# Altium PCB ES.PcbDoc (part 1 of 2)
Units mm, origin at the board's own origin, x right, y up, seen from the top; angles counter-clockwise.
Board outline 100.25 x 100.25 mm, 2 copper layers (Top Layer, Bottom Layer); 101 components, 47 nets, 272 pads, 52 vias.
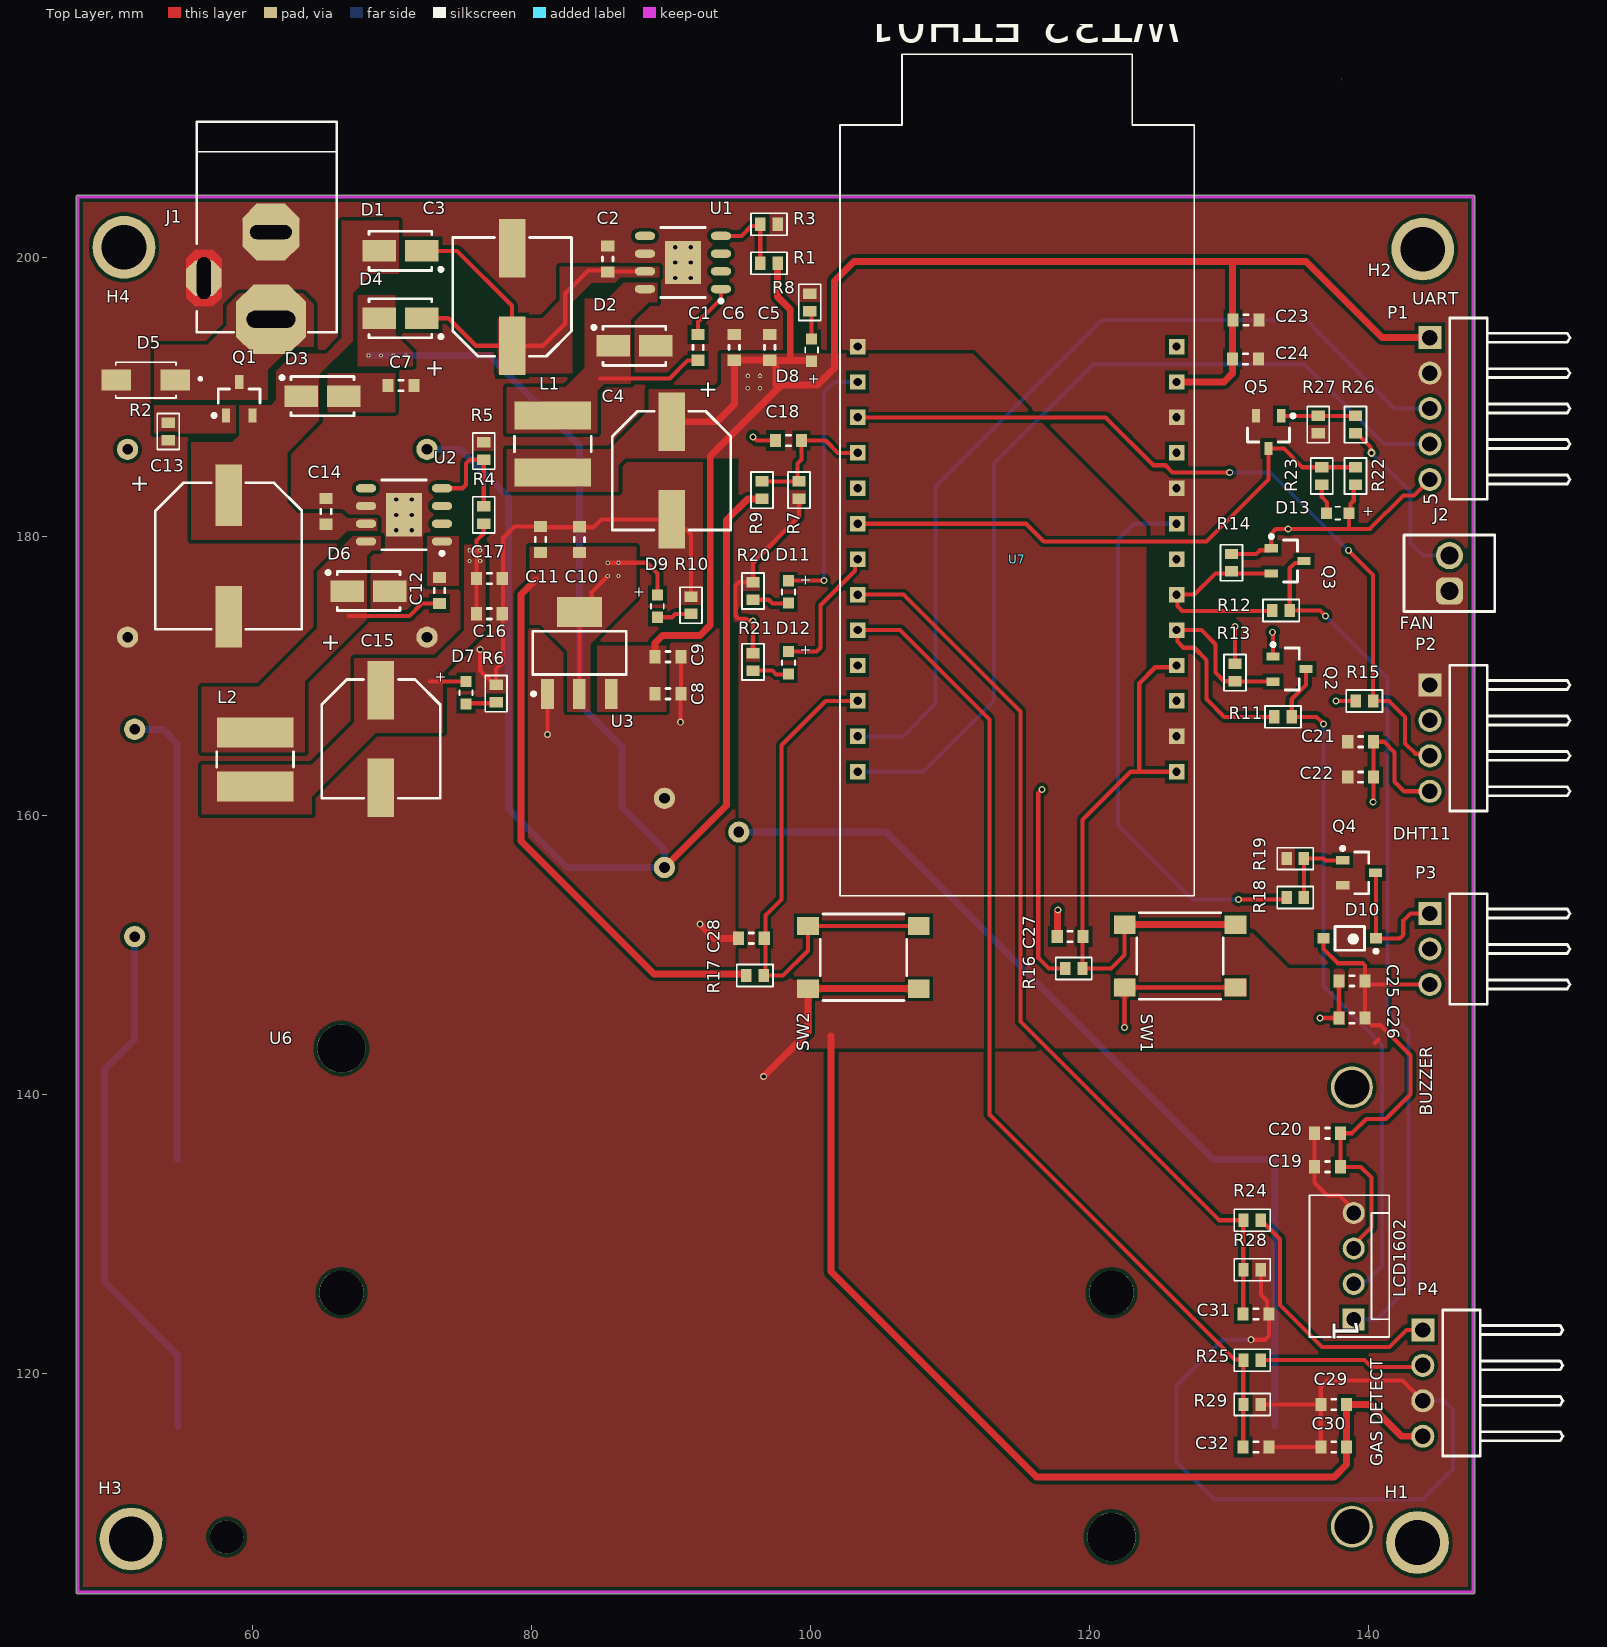
[diagram p0: Top Layer view]
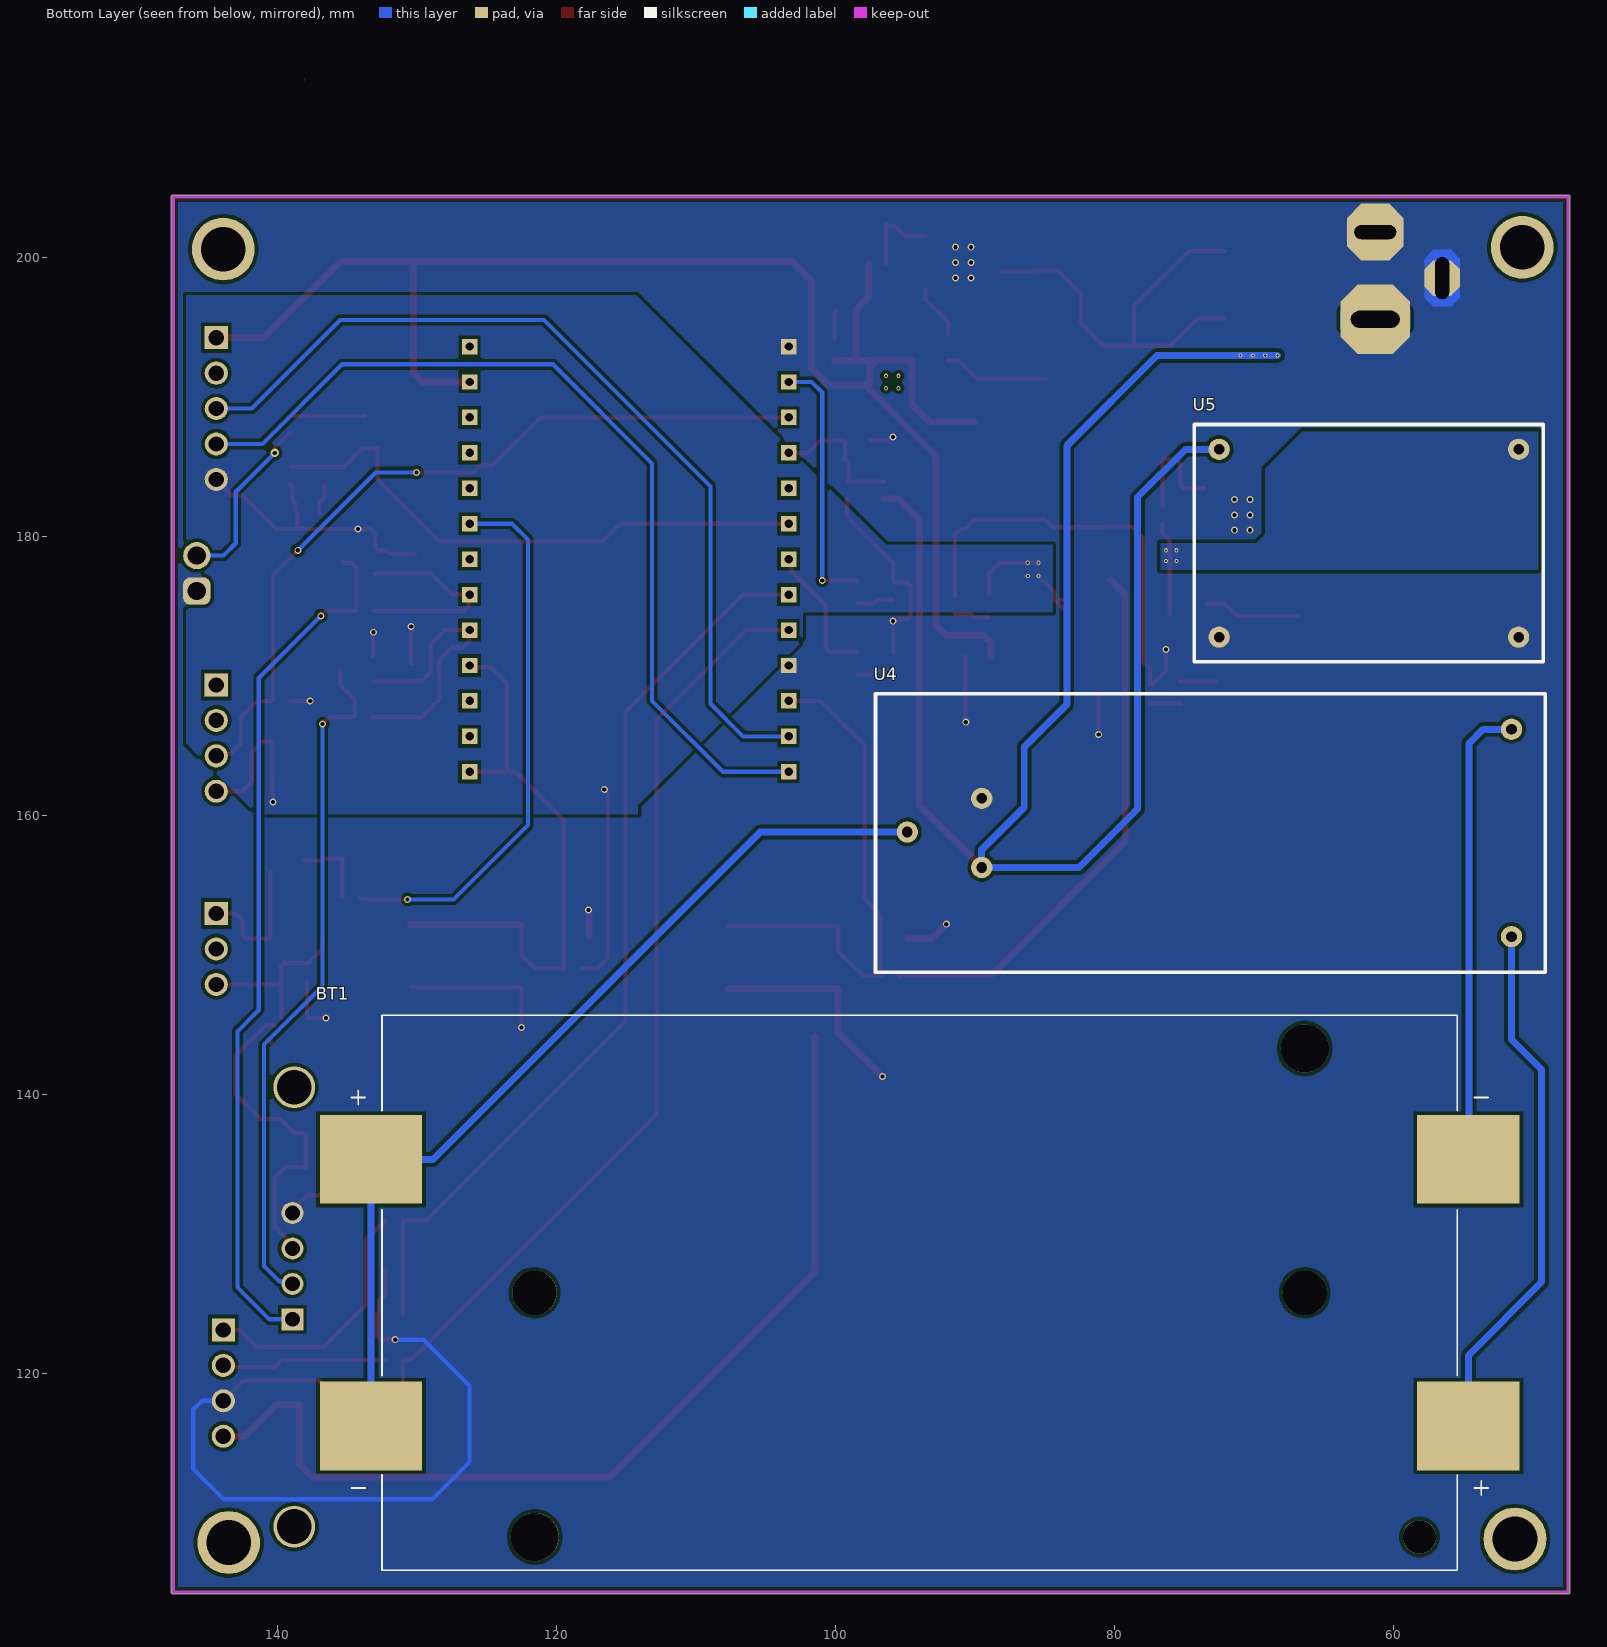
[diagram p1: Bottom Layer view, seen from below]
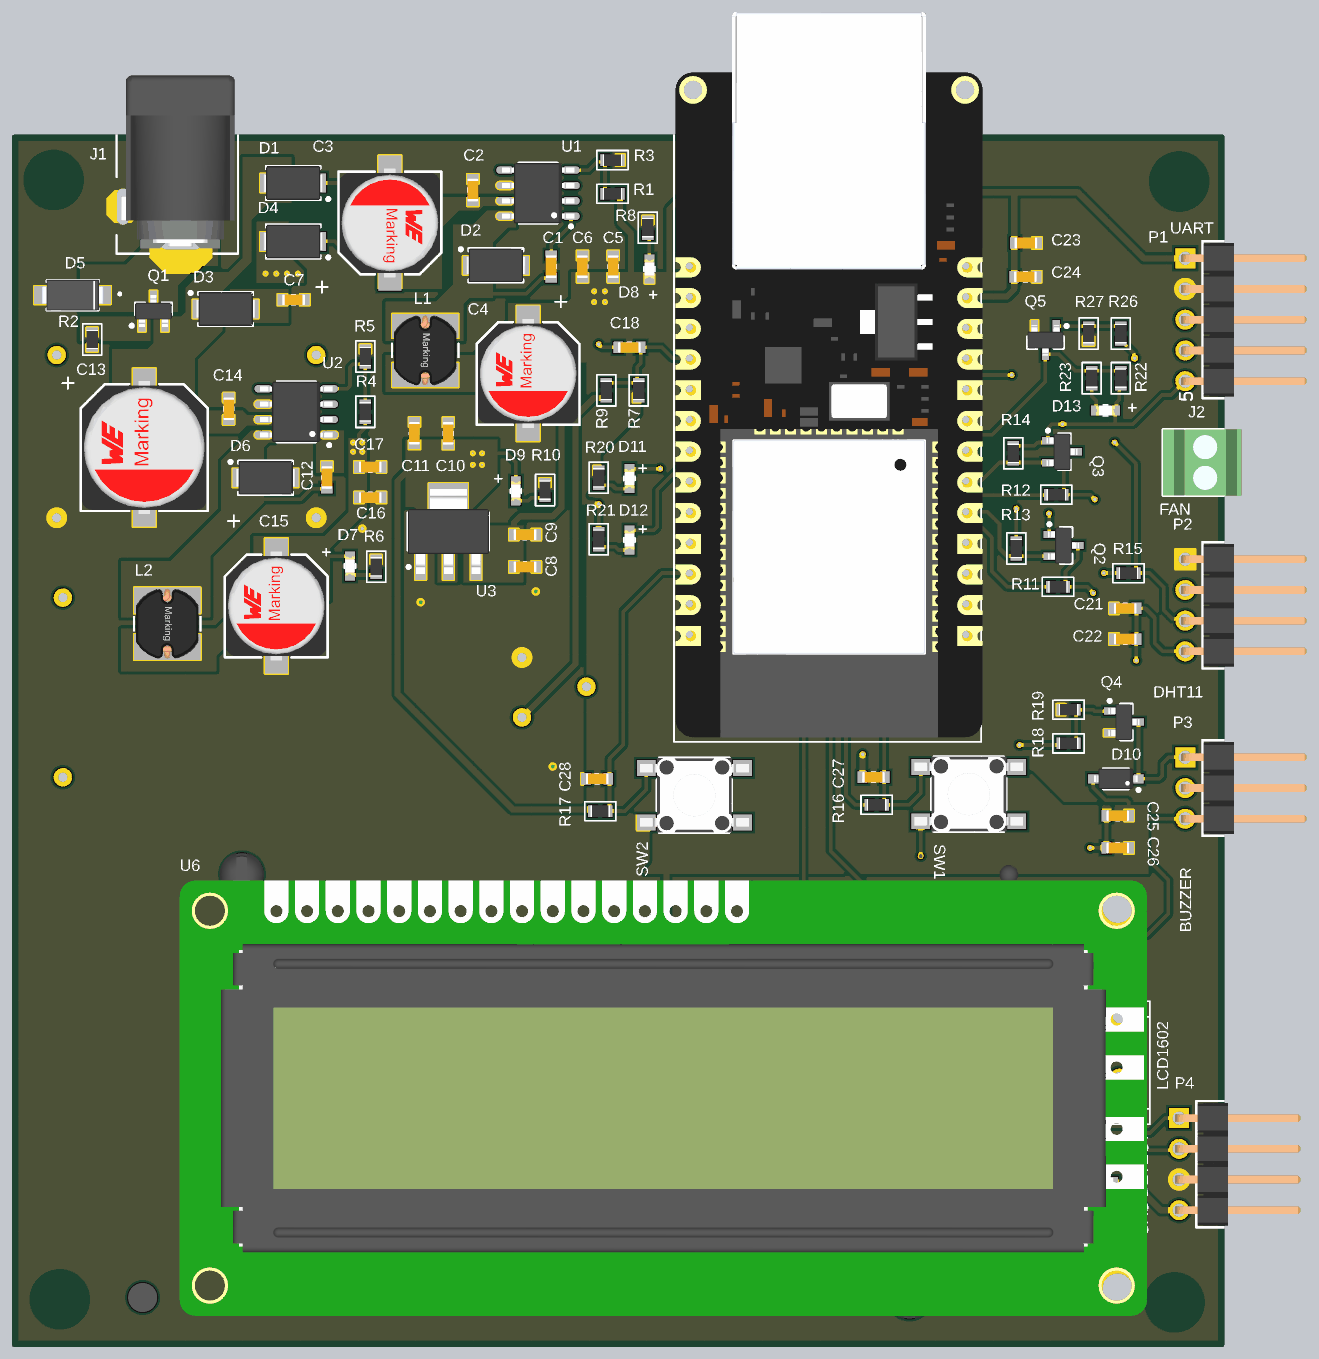
[diagram p3: 3D render of the assembled board from above, using the file's embedded part models]
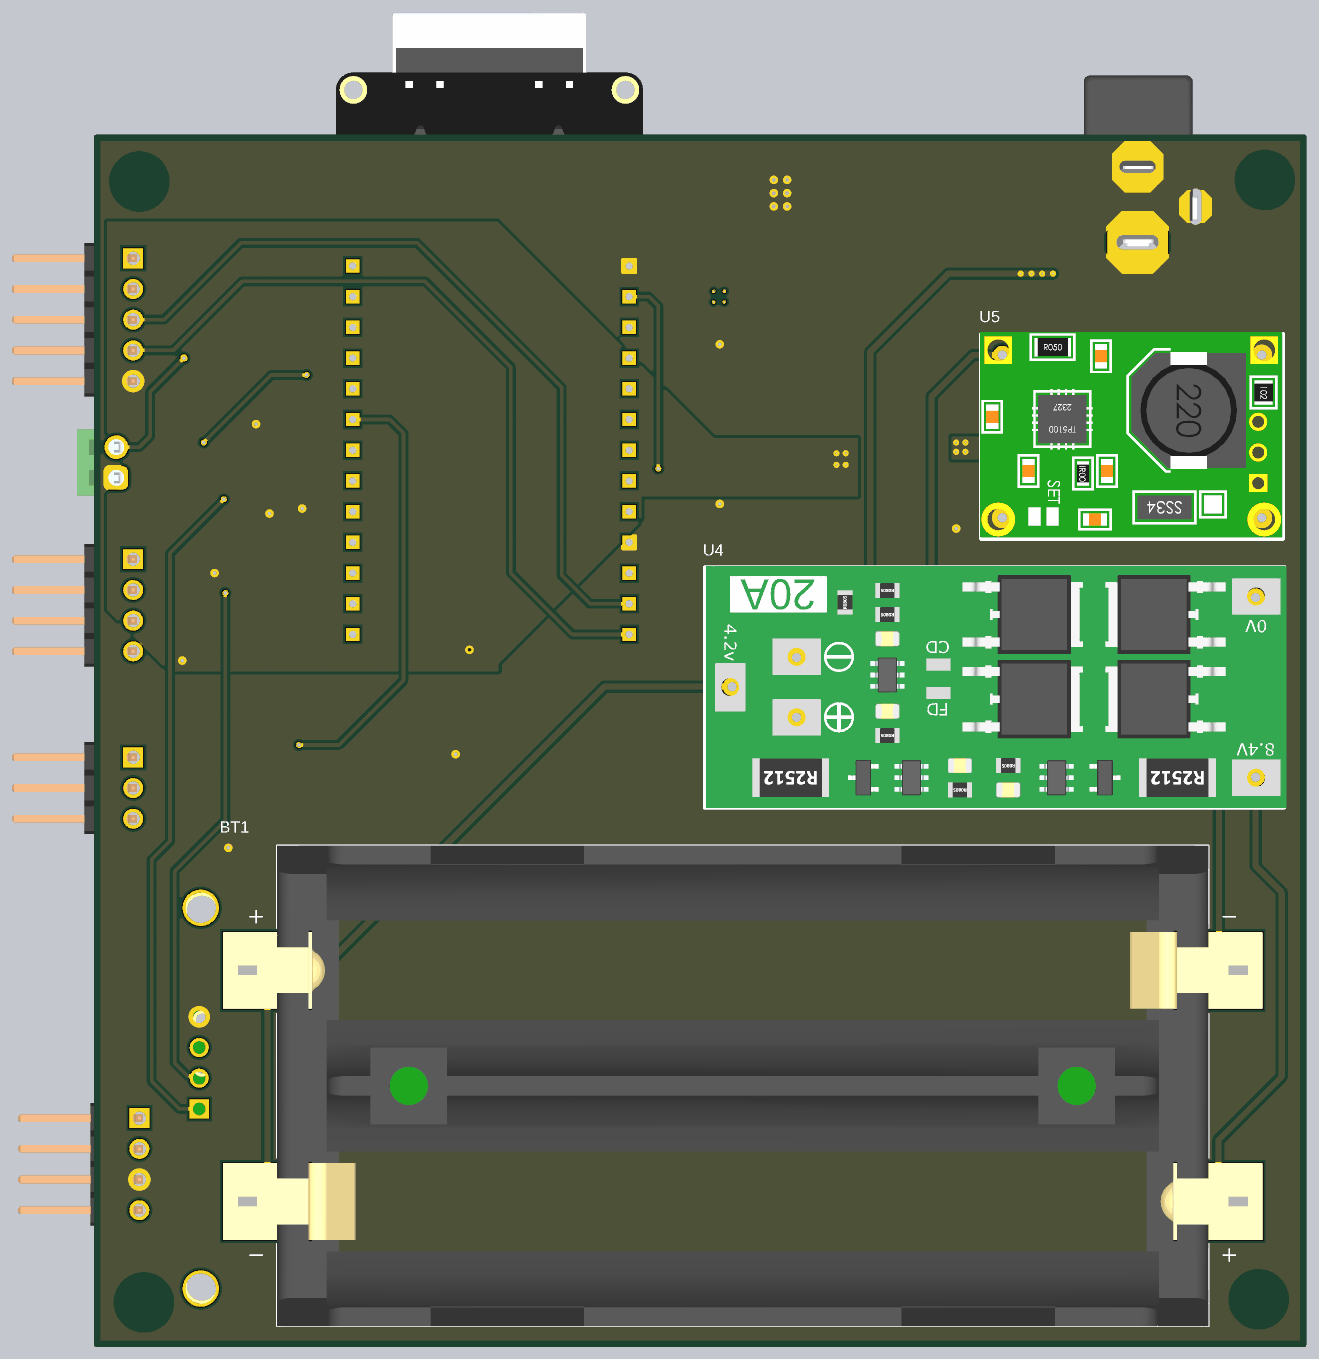
[diagram p4: 3D render of the assembled board from below, using the file's embedded part models]

## Layer stack, top to bottom
Top Solder: solder mask 0.0102, Solder Resist, Dk 3.5
Top Layer: signal copper 0.0356
Dielectric 1: dielectric 0.32, FR-4, Dk 4.8
Bottom Layer: signal copper 0.0356
Bottom Solder: solder mask 0.0102, Solder Resist, Dk 3.5

## Board outline
47.498,104.216 cw(c47.498,104.343) 47.371,104.343 47.371,204.343 cw(c47.498,204.343) 47.498,204.47 147.498,204.47 cw(c147.498,204.343) 147.625,204.343 147.625,104.343 cw(c147.498,104.343) 147.498,104.216

## Design rules (kind name [scope] priority, off if disabled: settings)
Clearance [All] p1: gap=0.254 ignorepadtopadclearanceinfootprint=FALSE
Height [All] p1: minheight=0 maxheight=50 prefheight=12.7
HoleSize [All] p1: absolutevalues=TRUE maxlimit=5 minlimit=0.025 maxpercent=80.000 minpercent=20.000
PolygonConnect PolygonConnect_62 [All vs IsNamedPolygon('GND_L02_P048')] p1: connectstyle=Direct reliefconductorwidth=0.254 reliefentries=4 polygonreliefangle="90 Angle" airgapwidth=0.254
PolygonConnect PolygonConnect_61 [All vs IsNamedPolygon('GND_L01_P049')] p2: connectstyle=Direct reliefconductorwidth=0.254 reliefentries=4 polygonreliefangle="90 Angle" airgapwidth=0.254
PolygonConnect PolygonConnect_60 [All vs IsNamedPolygon('NETC7_2_L01_P017')] p3: connectstyle=Direct reliefconductorwidth=0.254 reliefentries=4 polygonreliefangle="90 Angle" airgapwidth=0.254
PolygonConnect PolygonConnect_59 [All vs IsNamedPolygon('3V3_L02_P039')] p4: connectstyle=Direct reliefconductorwidth=0.254 reliefentries=4 polygonreliefangle="90 Angle" airgapwidth=0.254
PolygonConnect PolygonConnect_58 [All vs IsNamedPolygon('GND_L02_P041')] p5: connectstyle=Direct reliefconductorwidth=0.254 reliefentries=4 polygonreliefangle="90 Angle" airgapwidth=0.254
PolygonConnect PolygonConnect_57 [All vs IsNamedPolygon('GND_L01_P037')] p6: connectstyle=Direct reliefconductorwidth=0.254 reliefentries=4 polygonreliefangle="90 Angle" airgapwidth=0.254
PolygonConnect PolygonConnect_56 [All vs IsNamedPolygon('GND_L02_P035')] p7: connectstyle=Direct reliefconductorwidth=0.254 reliefentries=4 polygonreliefangle="90 Angle" airgapwidth=0.254
PolygonConnect PolygonConnect_55 [All vs IsNamedPolygon('GND_L01_P037')] p8: connectstyle=Direct reliefconductorwidth=0.254 reliefentries=4 polygonreliefangle="90 Angle" airgapwidth=0.254
PolygonConnect PolygonConnect_54 [All vs IsNamedPolygon('GND_L02_P035')] p9: connectstyle=Direct reliefconductorwidth=0.254 reliefentries=4 polygonreliefangle="90 Angle" airgapwidth=0.254
PolygonConnect PolygonConnect_53 [All vs IsNamedPolygon('GND_L01_P036')] p10: connectstyle=Direct reliefconductorwidth=0.254 reliefentries=4 polygonreliefangle="90 Angle" airgapwidth=0.254
PolygonConnect PolygonConnect_52 [All vs IsNamedPolygon('3V3_L02_P032')] p11: connectstyle=Direct reliefconductorwidth=0.254 reliefentries=4 polygonreliefangle="90 Angle" airgapwidth=0.254
PolygonConnect PolygonConnect_51 [All vs IsNamedPolygon('3V3_L02_P031')] p12: connectstyle=Direct reliefconductorwidth=0.254 reliefentries=4 polygonreliefangle="90 Angle" airgapwidth=0.254
PolygonConnect PolygonConnect_50 [All vs IsNamedPolygon('5V_L01_P030')] p13: connectstyle=Direct reliefconductorwidth=0.254 reliefentries=4 polygonreliefangle="90 Angle" airgapwidth=0.254
PolygonConnect PolygonConnect_49 [All vs IsNamedPolygon('5V_L01_P029')] p14: connectstyle=Direct reliefconductorwidth=0.254 reliefentries=4 polygonreliefangle="90 Angle" airgapwidth=0.254
PolygonConnect PolygonConnect_48 [All vs IsNamedPolygon('BATTERY+_L02_P028')] p15: connectstyle=Direct reliefconductorwidth=0.254 reliefentries=4 polygonreliefangle="90 Angle" airgapwidth=0.254
PolygonConnect PolygonConnect_47 [All vs IsNamedPolygon('9.5V_L02_P027')] p16: connectstyle=Direct reliefconductorwidth=0.254 reliefentries=4 polygonreliefangle="90 Angle" airgapwidth=0.254
PolygonConnect PolygonConnect_46 [All vs IsNamedPolygon('BATTERY+_L01_P025')] p17: connectstyle=Direct reliefconductorwidth=0.254 reliefentries=4 polygonreliefangle="90 Angle" airgapwidth=0.254
PolygonConnect PolygonConnect_45 [All vs IsNamedPolygon('NETC12_1_L01_P013')] p18: connectstyle=Direct reliefconductorwidth=0.254 reliefentries=4 polygonreliefangle="90 Angle" airgapwidth=0.254
PolygonConnect PolygonConnect_44 [All vs IsNamedPolygon('NETC12_2_L01_P014')] p19: connectstyle=Direct reliefconductorwidth=0.254 reliefentries=4 polygonreliefangle="90 Angle" airgapwidth=0.254
PolygonConnect PolygonConnect_43 [All vs IsNamedPolygon('9.5V_L01_P016')] p20: connectstyle=Direct reliefconductorwidth=0.254 reliefentries=4 polygonreliefangle="90 Angle" airgapwidth=0.254
PolygonConnect PolygonConnect_42 [All vs IsNamedPolygon('NETC1_1_L01_P018')] p21: connectstyle=Direct reliefconductorwidth=0.254 reliefentries=4 polygonreliefangle="90 Angle" airgapwidth=0.254
PolygonConnect PolygonConnect_41 [All vs IsNamedPolygon('Top Layer-VCC')] p22: connectstyle=Direct reliefconductorwidth=0.254 reliefentries=4 polygonreliefangle="90 Angle" airgapwidth=0.254
PolygonConnect PolygonConnect_40 [All vs IsNamedPolygon('5V_L01_P019')] p23: connectstyle=Direct reliefconductorwidth=0.254 reliefentries=4 polygonreliefangle="90 Angle" airgapwidth=0.254
PolygonConnect PolygonConnect_39 [All vs IsNamedPolygon('V_SUPPLY_L01_P021')] p24: connectstyle=Direct reliefconductorwidth=0.254 reliefentries=4 polygonreliefangle="90 Angle" airgapwidth=0.254
PolygonConnect PolygonConnect_38 [All vs IsNamedPolygon('NETC1_1_L01_P022')] p25: connectstyle=Direct reliefconductorwidth=0.254 reliefentries=4 polygonreliefangle="90 Angle" airgapwidth=0.254
PolygonConnect PolygonConnect_37 [All vs IsNamedPolygon('5V_L01_P023')] p26: connectstyle=Direct reliefconductorwidth=0.254 reliefentries=4 polygonreliefangle="90 Angle" airgapwidth=0.254
PolygonConnect PolygonConnect_36 [All vs IsNamedPolygon('3V3_L01_P024')] p27: connectstyle=Direct reliefconductorwidth=0.254 reliefentries=4 polygonreliefangle="90 Angle" airgapwidth=0.254
PolygonConnect PolygonConnect_35 [All vs IsNamedPolygon('NETC12_1_L01_P012')] p28: connectstyle=Direct reliefconductorwidth=0.254 reliefentries=4 polygonreliefangle="90 Angle" airgapwidth=0.254
PolygonConnect PolygonConnect_34 [All vs IsNamedPolygon('VIN_L01_P011')] p29: connectstyle=Direct reliefconductorwidth=0.254 reliefentries=4 polygonreliefangle="90 Angle" airgapwidth=0.254
PolygonConnect PolygonConnect_33 [All vs IsNamedPolygon('VIN_L01_P009')] p30: connectstyle=Direct reliefconductorwidth=0.254 reliefentries=4 polygonreliefangle="90 Angle" airgapwidth=0.254
PolygonConnect PolygonConnect_32 [All vs IsNamedPolygon('VIN_L01_P006')] p31: connectstyle=Direct reliefconductorwidth=0.254 reliefentries=4 polygonreliefangle="90 Angle" airgapwidth=0.254
PolygonConnect PolygonConnect_31 [All vs IsNamedPolygon('NETQ1_1_L01_P005')] p32: connectstyle=Direct reliefconductorwidth=0.254 reliefentries=4 polygonreliefangle="90 Angle" airgapwidth=0.254
PolygonConnect PolygonConnect_30 [All vs IsNamedPolygon('NETC12_1_L01_P012')] p33: connectstyle=Direct reliefconductorwidth=0.254 reliefentries=4 polygonreliefangle="90 Angle" airgapwidth=0.254
PolygonConnect PolygonConnect_29 [All vs IsNamedPolygon('GND_L01_P029')] p34: connectstyle=Direct reliefconductorwidth=0.254 reliefentries=4 polygonreliefangle="90 Angle" airgapwidth=0.254
PolygonConnect PolygonConnect_28 [All vs IsNamedPolygon('BATTERY+_L01_P028')] p35: connectstyle=Direct reliefconductorwidth=0.254 reliefentries=4 polygonreliefangle="90 Angle" airgapwidth=0.254
PolygonConnect PolygonConnect_27 [All vs IsNamedPolygon('BATTERY+_L01_P028')] p36: connectstyle=Direct reliefconductorwidth=0.254 reliefentries=4 polygonreliefangle="90 Angle" airgapwidth=0.254
PolygonConnect PolygonConnect_26 [All vs IsNamedPolygon('tg')] p37: connectstyle=Direct reliefconductorwidth=0.254 reliefentries=4 polygonreliefangle="90 Angle" airgapwidth=0.254
PolygonConnect PolygonConnect_25 [All vs IsNamedPolygon('9.5V_L01_P010')] p38: connectstyle=Direct reliefconductorwidth=0.254 reliefentries=4 polygonreliefangle="90 Angle" airgapwidth=0.254
PolygonConnect PolygonConnect_24 [All vs IsNamedPolygon('GND_L01_P027')] p39: connectstyle=Direct reliefconductorwidth=0.254 reliefentries=4 polygonreliefangle="90 Angle" airgapwidth=0.254
PolygonConnect PolygonConnect_23 [All vs IsNamedPolygon('GND_L01_P022')] p40: connectstyle=Direct reliefconductorwidth=0.254 reliefentries=4 polygonreliefangle="90 Angle" airgapwidth=0.254
PolygonConnect PolygonConnect_22 [All vs IsNamedPolygon('3V3_L01_P018')] p41: connectstyle=Direct reliefconductorwidth=0.254 reliefentries=4 polygonreliefangle="90 Angle" airgapwidth=0.254
PolygonConnect PolygonConnect_21 [All vs IsNamedPolygon('+5_L01_P020')] p42: connectstyle=Direct reliefconductorwidth=0.254 reliefentries=4 polygonreliefangle="90 Angle" airgapwidth=0.254
PolygonConnect PolygonConnect_20 [All vs IsNamedPolygon('+5_L01_P019')] p43: connectstyle=Direct reliefconductorwidth=0.254 reliefentries=4 polygonreliefangle="90 Angle" airgapwidth=0.254
PolygonConnect PolygonConnect_19 [All vs IsNamedPolygon('+5_L01_P019')] p44: connectstyle=Direct reliefconductorwidth=0.254 reliefentries=4 polygonreliefangle="90 Angle" airgapwidth=0.254
PolygonConnect PolygonConnect_18 [All vs IsNamedPolygon('+5_L01_P017')] p45: connectstyle=Direct reliefconductorwidth=0.254 reliefentries=4 polygonreliefangle="90 Angle" airgapwidth=0.254
PolygonConnect PolygonConnect_17 [All vs IsNamedPolygon('+5_L01_P016')] p46: connectstyle=Direct reliefconductorwidth=0.254 reliefentries=4 polygonreliefangle="90 Angle" airgapwidth=0.254
PolygonConnect PolygonConnect_16 [All vs IsNamedPolygon('NETC1_1_L01_P014')] p47: connectstyle=Direct reliefconductorwidth=0.254 reliefentries=4 polygonreliefangle="90 Angle" airgapwidth=0.254
PolygonConnect PolygonConnect_15 [All vs IsNamedPolygon('NETC1_2_L01_P013')] p48: connectstyle=Direct reliefconductorwidth=0.254 reliefentries=4 polygonreliefangle="90 Angle" airgapwidth=0.254
PolygonConnect PolygonConnect_14 [All vs IsNamedPolygon('V_SUPPLY_L01_P012')] p49: connectstyle=Direct reliefconductorwidth=0.254 reliefentries=4 polygonreliefangle="90 Angle" airgapwidth=0.254
PolygonConnect PolygonConnect_13 [All vs IsNamedPolygon('Top Layer-NetR4_1')] p50: connectstyle=Direct reliefconductorwidth=0.254 reliefentries=4 polygonreliefangle="90 Angle" airgapwidth=0.254
PolygonConnect PolygonConnect_12 [All vs IsNamedPolygon('+9.5_L01_P010')] p51: connectstyle=Direct reliefconductorwidth=0.254 reliefentries=4 polygonreliefangle="90 Angle" airgapwidth=0.254
PolygonConnect PolygonConnect_11 [All vs IsNamedPolygon('NETC12_2_L01_P008')] p52: connectstyle=Direct reliefconductorwidth=0.254 reliefentries=4 polygonreliefangle="90 Angle" airgapwidth=0.254
PolygonConnect PolygonConnect_10 [All vs IsNamedPolygon('+9.5_L01_P010')] p53: connectstyle=Direct reliefconductorwidth=0.254 reliefentries=4 polygonreliefangle="90 Angle" airgapwidth=0.254
PolygonConnect PolygonConnect_9 [All vs IsNamedPolygon('NETR4_1_L01_P009')] p54: connectstyle=Direct reliefconductorwidth=0.254 reliefentries=4 polygonreliefangle="90 Angle" airgapwidth=0.254
PolygonConnect PolygonConnect_8 [All vs IsNamedPolygon('NETR4_1_L01_P007')] p55: connectstyle=Direct reliefconductorwidth=0.254 reliefentries=4 polygonreliefangle="90 Angle" airgapwidth=0.254
PolygonConnect PolygonConnect_7 [All vs IsNamedPolygon('NETC7_2_L01_P006')] p56: connectstyle=Direct reliefconductorwidth=0.254 reliefentries=4 polygonreliefangle="90 Angle" airgapwidth=0.254
PolygonConnect PolygonConnect_6 [All vs IsNamedPolygon('NETC12_1_L01_P005')] p57: connectstyle=Direct reliefconductorwidth=0.254 reliefentries=4 polygonreliefangle="90 Angle" airgapwidth=0.254
PolygonConnect PolygonConnect_5 [All vs IsNamedPolygon('Top Layer-Vin')] p58: connectstyle=Direct reliefconductorwidth=0.254 reliefentries=4 polygonreliefangle="90 Angle" airgapwidth=0.254
PolygonConnect PolygonConnect_4 [All vs IsNamedPolygon('VIN_L01_P003')] p59: connectstyle=Direct reliefconductorwidth=0.254 reliefentries=4 polygonreliefangle="90 Angle" airgapwidth=0.254
PolygonConnect PolygonConnect_3 [All vs IsNamedPolygon('VIN_L01_P002')] p60: connectstyle=Direct reliefconductorwidth=0.254 reliefentries=4 polygonreliefangle="90 Angle" airgapwidth=0.254
PolygonConnect PolygonConnect_2 [All vs IsNamedPolygon('NETQ1_1_L01_P001')] p61: connectstyle=Direct reliefconductorwidth=0.254 reliefentries=4 polygonreliefangle="90 Angle" airgapwidth=0.254
PolygonConnect PolygonConnect_1 [All vs IsNamedPolygon('VCC_L01_P000')] p62: connectstyle=Direct reliefconductorwidth=0.254 reliefentries=4 polygonreliefangle="90 Angle" airgapwidth=0.254
PolygonConnect [All] p63: connectstyle=Relief reliefconductorwidth=0.254 reliefentries=4 polygonreliefangle="90 Angle" airgapwidth=0.254
RoutingVias [All] p1: holewidth=0.3 width=0.6 viastyle="Through Hole" minholewidth=0.025 minwidth=0.3 maxholewidth=0.3 maxwidth=0.6
SilkToSolderMaskClearance [IsPad] p1 off: minsilkscreentomaskgap=0.254 clearancetoexposedcopper=TRUE
SolderMaskExpansion [All] p1: expansion=0.102 istentingtop=FALSE
SupplyNets "Schematic Supply Nets_9" [InNet('5V')] p1: voltage=0.000
SupplyNets "Schematic Supply Nets_2" [InNet('9.5V')] p2: voltage=0.000
SupplyNets "Schematic Supply Nets_7" [InNet('V_SUPPLY')] p3: voltage=0.000
SupplyNets "Schematic Supply Nets_6" [InNet('3V3')] p4: voltage=0.000
SupplyNets "Schematic Supply Nets_5" [InNet('Vin')] p5: voltage=0.000
SupplyNets "Schematic Supply Nets_4" [InNet('BATTERY+')] p6: voltage=0.000
SupplyNets "Schematic Supply Nets_3" [InNet('VCC')] p7: voltage=0.000
SupplyNets "Schematic Supply Nets" [InNet('GND')] p8: voltage=0.000
Width [All] p1: maxlimit=0.5 minlimit=0.2 preferedwidth=0.3 minimp=50.000000 maximp=50.000000 favimp=50.000000
27 further rules are at their usual default settings.

## Classes and differential pairs
component class 02_MCU_ESP32_WROOM: C19 C20 C21 C22 C25 C26 C30 C32 D10 D12 P4 Q2 Q3 Q5 R17 R19 R29 U7
component class 01_POWER_DIAGRAM: C1 C6 C7 C8 C9 C10 C11 C12 C13 C14 C15 C16 C17 C18 D1 D2 D3 D4 D5 D6 J1 L1 L2 Q1 R1 R4 R5 R9 U1

## Components (designator, comment, footprint, x,y, rotation, side; value= is the part's Value field where it differs from the comment)
BT1 "1048P" BAT_1048P 93.98,125.796 r180 bottom
C1 "10 nF, 50 VDC" CAP_0603 91.948,193.56 r90 top value="10 nF"
C2 "10 uF, 50 VDC" CAP_0603 85.471,199.891 r270 top value="10 uF"
C3 "220uF, 35V" WCAP-ASLI_D8H10.5 78.613,197.17 r270 top
C4 "220uF, 35V" WCAP-ASLI_D8H10.5 90.043,184.724 r90 top
C5 "10 uF, 25 VDC" CAP_0603 97.082,193.56 r270 top value="10 uF"
C6 "10 uF, 25 VDC" CAP_0603 94.542,193.56 r270 top value="10 uF"
C7 "100 nF, 50 VDC" CAP_0603 70.648,190.82 r180 top value="100 nF"
C8 "10 uF, 10 VDC" CAP_0603 89.789,168.722 r180 top value="10 uF"
C9 "10 uF, 10 VDC" CAP_0603 89.789,171.389 r180 top value="10 uF"
C10 "10 uF, 10 VDC" CAP_0603 83.439,179.771 r270 top value="10 uF"
C11 "10 uF, 10 VDC" CAP_0603 80.645,179.783 r270 top value="10 uF"
C12 "10 nF, 50 VDC" CAP_0603 73.406,176.124 r90 top value="10 nF"
C13 "470uF, 25V" WCAP-ASLI_D10H10.5 58.293,178.596 r90 top
C14 "10 uF, 50 VDC" CAP_0603 65.278,181.803 r270 top value="10 uF"
C15 "220uF, 35V" WCAP-ASLI_D8H10.5 69.215,165.491 r90 top
C16 "10 uF, 25 VDC" CAP_0603 76.985,174.468 r180 top value="10 uF"
C17 "10 uF, 25 VDC" CAP_0603 76.985,176.983 r180 top value="10 uF"
C18 "100 nF, 50 VDC" CAP_0603 98.425,186.883 r0 top value="100 nF"
C19 "100nF, 10 VDC" CAP_0603 137.056,134.819 r0 top value="10 uF"
C20 "10 uF, 10 VDC" CAP_0603 137.056,137.232 r0 top value="10 uF"
C21 "100nF, 10 VDC" CAP_0603 139.434,165.293 r0 top value="10 uF"
C22 "10 uF, 10 VDC" CAP_0603 139.434,162.753 r0 top value="10 uF"
C23 "100nF, 10 VDC" CAP_0603 131.214,195.513 r180 top value="10 uF"
C24 "10 uF, 10 VDC" CAP_0603 131.178,192.719 r180 top value="10 uF"
C25 "100nF, 10 VDC" CAP_0603 138.811,148.148 r0 top value="10 uF"
C26 "10 uF, 10 VDC" CAP_0603 138.811,145.481 r0 top value="10 uF"
C27 "100nF, 10 VDC" CAP_0603 118.618,151.329 r0 top value="10 uF"
C28 "100nF, 10 VDC" CAP_0603 95.758,151.196 r0 top value="10 uF"
C29 "100nF, 16 VDC" CAP_0603 137.506,117.789 r0 top value="10 uF"
C30 "10 uF, 16 VDC" CAP_0603 137.506,114.741 r0 top value="10 uF"
C31 "100 nF, 50 VDC" CAP_0603 131.93,124.266 r180 top value="100 nF"
C32 "100 nF, 50 VDC" CAP_0603 131.93,114.741 r180 top value="100 nF"
D1 "3 A , 40V" "SMA (DO-214AC)" 70.612,200.472 r180 top
D2 "3 A , 40V" "SMA (DO-214AC)" 87.376,193.664 r0 top
D3 "1SMA5927BT3G" "SMA (DO-214AC)" 65.025,190.058 r0 top
D4 "3 A , 40V" "SMA (DO-214AC)" 70.612,195.646 r180 top
D5 "SMAJ28A" DIOM4325X250N 52.368,191.201 r180 top
D6 "3 A , 40V" "SMA (DO-214AC)" 68.327,176.088 r0 top
D7 "XL-1608UBC-04" WL-SMCW_0603_H=0.7mm 75.311,168.795 r90 top
D8 "XL-1608UBC-04" WL-SMCW_0603_H=0.7mm 100.076,193.36 r270 top
D9 "XL-1608UBC-04" WL-SMCW_0603_H=0.7mm 89.033,175.005 r90 top
D10 "150 mA , 1.2V" SOD-123 138.654,151.196 r180 top
D11 "XL-1608UGC-04" WL-SMCW_0603_H=0.7mm 98.425,176.027 r90 top
D12 "XL-1608UBC-04" WL-SMCW_0603_H=0.7mm 98.425,170.947 r90 top
D13 "XL-1608UGC-04" WL-SMCW_0603_H=0.7mm 137.795,181.666 r0 top
H1 "Mounting hole M3" "Mounting hole M3" 108.204,0.701 r0 top
H2 "Mounting hole M3" "Mounting hole M3" 108.585,93.411 r0 top
H3 "Mounting hole M3" "Mounting hole M3" 16.002,0.955 r0 top
H4 "Mounting hole M3" "Mounting hole M3" 15.494,93.538 r0 top
J1 "DC-005H-D020" DC-005H-D020 58.928,198.694 r270 top
J2 "6A, 150V" 691210910002 145.796,177.358 r90 top
L1 "15uH, 1.1A" WE-PD2A_5D28 81.534,186.629 r270 top
L2 "6.8uH, 2.2A" WE-PD2A_5848 60.198,164.023 r270 top
P1 "3A, 250 V (AC)" 61300511021 147.169,189.169 r90 top
P2 "3A, 250 V (AC)" 61300411021 147.169,165.547 r90 top
P3 "3A, 250 V (AC)" 61300311021 147.169,150.434 r90 top
P4 "3A, 250 V (AC)" 61300411021 146.661,119.319 r90 top
Q1 "IRLML5203TRPBF" IRLML5203TRPBF 59.055,189.874 r90 top
Q2 "BSS138-7-F" BSS138-7-F-SOT23 134.334,170.5 r0 top
Q3 "BSS138-7-F" BSS138-7-F-SOT23 134.207,178.247 r0 top
Q4 "BSS138-7-F" BSS138-7-F-SOT23 139.319,155.895 r0 top
Q5 "BSS138-7-F" BSS138-7-F-SOT23 132.831,187.476 r270 top
R1 "10 kOhm, 1/10 W" RES_0603 97.028,199.583 r0 top value="10 kOhm"
R2 "100 kOhm, 1/10 W" RES_0603 53.975,187.528 r90 top value="100 kOhm"
R3 "3.3 kOhm, 1/10 W" RES_0603 97.028,202.377 r180 top value="3.3 kOhm"
R4 "10 kOhm, 1/10 W" RES_0603 76.581,181.549 r270 top value="10 kOhm"
R5 "1.47 kOhm, 1/10 W" RES_0603 76.581,186.121 r270 top value="3.3 kOhm"
R6 "10 kOhm" RES_0603 77.47,168.732 r90 top value="300 Ohm"
R7 "47 kOhm, 1/10 W" RES_0603 99.187,183.327 r270 top value="47 kOhm"
R8 "4.7kOhm" RES_0603 99.949,196.779 r90 top value="300 Ohm"
R9 "100 kOhm, 1/10 W" RES_0603 96.52,183.327 r270 top value="100 kOhm"
R10 "2.2kOhm" RES_0603 91.44,175.072 r90 top value="300 Ohm"
R11 "0 Ohm, 1/10 W" RES_0603 133.868,167.071 r180 top value="0 Ohm"
R12 "0 Ohm, 1/10 W" RES_0603 133.731,174.691 r180 top value="0 Ohm"
R13 "4.7 kOhm, 1/10 W" RES_0603 130.429,170.246 r270 top value="4.7 kOhm"
R14 "4.7 kOhm, 1/10 W" RES_0603 130.175,178.12 r270 top value="4.7 kOhm"
R15 "10 kOhm, 1/10 W" RES_0603 139.7,168.214 r180 top value="10 kOhm"
R16 "10kOhm" RES_0603 118.872,149.043 r0 top value="300 Ohm"
R17 "10kOhm" RES_0603 96.012,148.529 r0 top value="300 Ohm"
R18 "1 kOhm, 1/10 W" RES_0603 134.747,154.117 r0 top value="1 kOhm"
R19 "10 kOhm, 1/10 W" RES_0603 134.747,156.911 r0 top value="10 kOhm"
R20 "2.2kOhm" RES_0603 95.885,176.093 r90 top value="300 Ohm"
R21 "2.2kOhm" RES_0603 95.885,171.013 r90 top value="300 Ohm"
R22 "10 kOhm, 1/10 W" RES_0603 139.065,184.333 r270 top value="1 kOhm"
R23 "1 kOhm, 1/10 W" RES_0603 136.652,184.333 r270 top value="1 kOhm"
R24 "22 kOhm, 1/10 W" RES_0603 131.664,130.997 r180 top value="22 kOhm"
R25 "22 kOhm, 1/10 W" RES_0603 131.664,120.964 r0 top value="22 kOhm"
R26 "1 kOhm, 1/10 W" RES_0603 139.065,188.016 r90 top value="1 kOhm"
R27 "10 kOhm, 1/10 W" RES_0603 136.398,188.016 r90 top value="10 kOhm"
R28 "33 kOhm, 1/10 W" RES_0603 131.664,127.441 r180 top value="38 kOhm"
R29 "33 kOhm, 1/10 W" RES_0603 131.664,117.789 r180 top value="38 kOhm"
SW1 "430152043826" WS-TASV_L6W6H4.3_4301x20438x6 126.492,149.926 r0 top
SW2 "430152043826" WS-TASV_L6W6H4.3_4301x20438x6 103.797,149.835 r0 top
U1 "TPS5430DDAR-ADJ, 3 A" TPS5430DDAR 90.863,199.637 r180 top
U2 "TPS5430DDAR-ADJ, 3 A" TPS5430DDAR 70.866,181.549 r180 top
U3 "AMS1117-3.3V, 1A" "AMS1117-3.3V SOT223" 83.443,171.652 r90 top
U4 "BMS_BATTERY_PROTECTION" BMS_BATTERY_PROTECTION 49.149,168.722 r0 bottom
U5 "BATTERY CHARGER" TP5100_BATTERY_CHARGER 49.276,188.026 r0 bottom
U6 "LCD 1602 I2C" *KK2_54X4 137.668,127.701 r270 top
U7 "WT32-ETH01" WT32-ETH01 126.873,163.134 r180 top

## Footprints (in the part's own frame and the unit in brackets; to place one, negate y for a bottom-side part, rotate by r counter-clockwise, add the part's x,y. Pads: shape width x height; smd on the part's side, far side on the other; paste and mask are expansions set on the pad)
61300311021 [mm] "Pin Header, pitch 2.54 mm, THT, Angled, single row, 3p"
  rect 1.65x1.65 hole 1.1: 1(2.54,2.77)
  round 1.65 hole 1.1: 2(0,2.77) 3(-2.54,2.77)
  silkscreen extent -3.96,-7.27 3.96,1.35, body extent -3.81,-7.27 3.81,3.09, height 2.58
61300411021 [mm] "Pin Header, pitch 2.54 mm, THT, Angled, single row, 4p"
  rect 1.65x1.65 hole 1.1: 1(3.81,2.77)
  round 1.65 hole 1.1: 2(1.27,2.77) 3(-1.27,2.77) 4(-3.81,2.77)
  silkscreen extent -5.23,-7.27 5.23,1.35, body extent -5.08,-7.27 5.08,3.09, height 2.58
61300511021 [mm] "Pin Header, pitch 2.54 mm, THT, Angled, single row, 5p"
  rect 1.65x1.65 hole 1.1: 1(5.08,2.77)
  round 1.65 hole 1.1: 2(2.54,2.77) 3(0,2.77) 4(-2.54,2.77) 5(-5.08,2.77)
  silkscreen extent -6.5,-7.27 6.5,1.35, body extent -6.35,-7.27 6.35,3.09, height 2.58
691210910002 [mm] "2,54mm - modular - green - Horizontal wire entry - Cage clamp - 0,8mm2 wires - 02p"
  rrect50% 1.95x1.95 hole 1.3: 1(-1.27,0)
  round 1.95 hole 1.3: 2(1.27,0)
  silkscreen extent -2.74,-3.25 2.74,3.25, body extent -2.74,-3.25 2.74,3.25, height 8.55
*KK2_54X4 [mm]
  round 1.575 hole 1.05: 1(-3.81,1.27) 2(-1.27,1.27) 3(1.27,1.27)
  rect 1.575x1.575 hole 1.05: 4(3.81,1.27)
  round 3 hole 2.5: ""(-12.827,1.143) ""(18.669,1.143)
  silkscreen extent -5.08,-1.91 5.08,3.81, body extent -15.08,-76.44 20.92,3.56, height 34.9
"AMS1117-3.3V SOT223" [mm] "SOT223, 4-Leads, Body 6.51x7.00mm, Pitch 2.29mm"
  rect 2.15x0.9 smd: 1(-2.93,2.29) 2(-2.93,0) 3(-2.93,-2.29)
  rect 2.15x3.25 smd: 4(2.93,0)
  silkscreen extent -3.05,-3.35 1.55,3.41, body extent -3.5,-3.35 3.5,3.35, height 1.8
BAT_1048P [mm]
  rect 7.34x6.35 smd: N1(39.33,9.555) N2(-39.33,-9.555) P1(-39.33,9.555) P2(39.33,-9.555)
  round 3.45 hole 3.45 unplated: ""(-27.6,-17.505) ""(27.6,17.505)
  round 3.17 hole 3.17 unplated: ""(-27.6,0) ""(27.6,0)
  round 2.39 hole 2.39 unplated: ""(35.82,-17.505)
  silkscreen extent -40.75,-19.89 40.75,19.89, body extent -43,-19.89 43,19.89, height 15.05
BMS_BATTERY_PROTECTION [mil]
  round 60 hole 30: 1(95,685) 2(95,100) 3(1590,295) 4(1800,390) 5(1590,490)
  silkscreen extent 0,0 1890,785, body extent -5,-2 1885,785, height 150
BSS138-7-F-SOT23 [mm] "SOT23, 3-Leads, Body 2.90x2.40mm, Pitch 0.90mm, IPC Medium Density"
  rect 0.95x0.6 smd: 1(-1.175,0.9) 2(-1.175,-0.9) 3(1.175,0)
  silkscreen extent -1.3,-1.5 0.7,1.87, body extent -1.28,-1.5 1.28,1.5, height 1.02
CAP_0603 [mm] "Chip Capacitor, 2-Leads, Body 1.80x0.80mm, IPC Medium Density"
  rect 0.8x0.95 smd: 1(-0.925,0) 2(0.925,0)
  silkscreen extent -0.15,-0.38 0.15,0.38, body extent -0.95,-0.45 0.95,0.45, height 0.9
DC-005H-D020 [mm] "DC-005H-D020"
  oct 5x5 hole 1.2 slot 3.5 at 90 deg: 1(3.125,2.4)
  oct 4.064x4.064 hole 1 slot 3 at 90 deg: 2(-3.125,2.4)
  oct 2.54x2.54 hole 1 slot 3 at 0 deg: 3(0.175,-2.4)
  Top Layer region: -1.222,-3.67 -1.857,-3.035 -1.857,-1.765 -1.222,-1.13 1.572,-1.13 2.207,-1.765 2.207,-3.035 1.572,-3.67
  Top Layer region: -4.395,1.003 -3.76,0.368 -2.49,0.368 -1.855,1.003 -1.855,3.797 -2.49,4.432 -3.76,4.432 -4.395,3.797
  Top Layer region: 1.855,0.535 2.49,-0.1 3.76,-0.1 4.395,0.535 4.395,4.265 3.76,4.9 2.49,4.9 1.855,4.265
  Bottom Layer region: -1.222,-3.67 -1.857,-3.035 -1.857,-1.765 -1.222,-1.13 1.572,-1.13 2.207,-1.765 2.207,-3.035 1.572,-3.67
  Bottom Layer region: -4.395,1.003 -3.76,0.368 -2.49,0.368 -1.855,1.003 -1.855,3.797 -2.49,4.432 -3.76,4.432 -4.395,3.797
  Bottom Layer region: 1.855,0.535 2.49,-0.1 3.76,-0.1 4.395,0.535 4.395,4.265 3.76,4.9 2.49,4.9 1.855,4.265
  silkscreen extent -11.05,-2.92 4.06,7.11, body extent -10.67,-2.55 3.63,6.85, height 11
DIOM4325X250N [mm]
  rect 2.12x1.5 smd: A(2.115,0) C(-2.115,0)
  silkscreen extent -4,-1.28 2.16,1.28, body extent -2.57,-1.28 2.57,1.28, height 2.5
IRLML5203TRPBF [mm] "SOT23, 3-Leads, Body 2.92x2.37mm, Pitch 0.95mm, IPC Medium Density"
  rect 1x0.6 smd: 1(-1.2,0.95) 2(-1.2,-0.95) 3(1.2,0)
  silkscreen extent -1.32,-1.5 0.7,1.92, body extent -1.32,-1.52 1.32,1.52, height 1.12
"Mounting hole M3" [mm]
  round 4.5 hole 3.2: 1(35.306,107.188)
RES_0603 [mm] "Chip Resistor, 2-Leads, Body 1.55x0.85mm, IPC Medium Density"
  rect 0.75x0.95 smd: 1(-0.625,0) 2(0.625,0)
  silkscreen extent -1.3,-0.79 1.3,0.79, body extent -0.8,-0.48 0.8,0.48, height 0.5
"SMA (DO-214AC)" [mm] "Molded Diode, 2-Leads, Body 4.25x2.67mm, IPC Medium Density"
  rect 2.4x1.55 smd: 1(-1.525,0) 2(1.525,0)
  silkscreen extent -3.03,-1.4 2.25,1.45, body extent -2.47,-1.4 2.47,1.4, height 2.29
SOD-123 [mm] "SOIC, 2-Leads, Body 1.55x2.70mm, Pitch 1.27mm, IPC Medium Density"
  rect 0.85x0.75 smd: 1(-1.875,0) 2(1.875,0)
  silkscreen extent -2,-0.85 1.05,1.05, body extent -1.84,-0.85 1.84,0.85, height 1.35
TP5100_BATTERY_CHARGER [mil]
  round 60 hole 30: 1(70,600) 2(70,70) 3(915,70) 4(915,600)
  silkscreen extent 0,0 985,670, body extent 3,-5 987,665, height 161
TPS5430DDAR [mm] "SOP, 8-Leads, Body 4.90x3.90mm, Pitch 1.27mm, Thermal Pad 3.10x2.60mm, IPC Medium Density"
  oval 1.45x0.6 smd: 1(-2.725,1.905) 2(-2.725,0.635) 3(-2.725,-0.635) 4(-2.725,-1.905) 5(2.725,-1.905) 6(2.725,-0.635) 7(2.725,0.635) 8(2.725,1.905)
  rect 2.6x3.1 smd: 9(0,0)
  silkscreen extent -2.85,-2.5 1.6,2.88, body extent -3,-2.5 3,2.5, height 1.7
WCAP-ASLI_D8H10.5 [mm] "Aluminium Electrolytic V-Chip SMT Capacitors, 8x10.5mm"
  rect 4.2x1.9 smd: 1(3.5,0) 2(-3.5,0)
  silkscreen extent -4.25,-4.25 4.25,4.25, body extent -4.5,-4.15 4.5,4.15, height 10.5
WCAP-ASLI_D10H10.5 [mm] "Aluminium Electrolytic V-Chip SMT Capacitors, 10x10.5mm"
  rect 4.4x1.9 smd: 1(4.35,0) 2(-4.35,0)
  silkscreen extent -5.25,-5.25 5.25,5.25, body extent -5.5,-5.15 5.5,5.15, height 10.5
WE-PD2A_5D28 [mm] "SMD Power Inductor, body 5.8x5.2mm"
  rect 2x5.5 smd: 1(-2.032,0) 2(2.032,0)
  silkscreen extent -0.55,-2.75 0.55,2.75, body extent -2.9,-2.6 2.89,2.6, height 4.5
WE-PD2A_5848 [mm] "SMD Power Inductor, body 5.8x5.2mm"
  rect 2.15x5.5 smd: 1(-1.925,0) 2(1.925,0)
  silkscreen extent -0.55,-2.75 0.55,2.75, body extent -2.9,-2.6 2.89,2.6, height 4.5
WL-SMCW_0603_H=0.7mm [mm] "SMD Mono-color Chip LED, body 1.6x0.8mm"
  rect 0.8x0.8 smd: 1(-0.8,0) 2(0.8,0)
  silkscreen extent -0.18,-0.46 0.18,0.46, body extent -0.8,-0.4 0.8,0.4, height 0.7
WS-TASV_L6W6H4.3_4301x20438x6 [mm] "SMD Tact Switch, body 6x6mm"
  rect 1.55x1.3 smd: A1(-3.975,2.25) A2(3.975,2.25) B1(-3.975,-2.25) B2(3.975,-2.25)
  silkscreen extent -3.1,-3.1 3.1,3.1, body extent -4.5,-3.1 4.5,3.1, height 4.3
WT32-ETH01 [mm]
  rect 1.108x1.108 / inner round 1.108 / far side rect 1.108x1.108 hole 0.6: 3V3(0.635,-5.08) 3V3@1(0.635,-22.86) 5V(0.635,-27.94) 485_EN(0.635,-12.7) CFG(0.635,-10.16) EN(0.635,0) EN@1(0.635,-7.62) GND(0.635,-2.54) GND@1(0.635,-20.32) GND@2(0.635,-25.4) GND@3(23.495,-7.62) GND@4(23.495,-30.48) IO0(23.495,-5.08) IO2(23.495,-27.94) IO4(23.495,-25.4) IO12(23.495,-20.32) IO14(23.495,-17.78) IO15(23.495,-15.24) IO35(23.495,-22.86) IO36(23.495,-12.7) IO39(23.495,-10.16) LINK(0.635,-30.48) RX0(23.495,-2.54) RXD(0.635,-15.24) TX0(23.495,0) TXD(0.635,-17.78)
  silkscreen extent -0.64,-51.44 24.77,8.89, body extent -0.76,-51.49 24.64,8.51, height 17

## Part data
BT1: "SMT Polarized Holder for Dual 18650 Batteries", Package=None, Availability="In Stock", Check_prices=https://www.snapeda.com/parts/1048P/Keystone+Electronics/view-part/?ref=eda, MF="Keystone Electronics", MP=1048P, Price=None, Purchase-URL=https://pricing.snapeda.com/search/part/1048P/?ref=eda, SnapEDA_Link=https://www.snapeda.com/parts/1048P/Keystone+Electronics/view-part/?ref=snap
C1 C12: library part 0106031030550, "CAP, size 0603, 10 nF, 50 VDC, 5%", Capacitance="10 nF", LCSC Part #=N/A, Manufacturer=TDK, Manufacturer Part Number=CGA3E2C0G1H103J080AE, Operating Temperature Max="+ 85 C", Operating Temperature Min="- 40 C", Package / Case=0603, Supplier 1 Part Number=810-CGA3E2C0G1H103J8, Supplier 2 Part Number=445-CGA3E2C0G1H103J080AETR-ND, Tolerance=+/-5%, Voltage Rating DC="50 VDC", ComponentLink1Description=Datasheet, ComponentLink1URL=https://product.tdk.com/system/files/dam/doc/product/capacitor/ceramic/mlcc/catalog/mlcc_automotive_soft_en.pdf?ref_disty=mouser, Mount=SMD/SMT, Packaging="Tape and Reel", Supplier 1=Mouser, Supplier 1 URL=https://www.mouser.com/ProductDetail/TDK/CGA3E2C0G1H103J080AE?qs=P1JMDcb91o6ZkMITrWTUZQ%3D%3D&utm_source=mouser-refine-download&utm_medium=file&utm_campaign=CGA3E2C0G1H103J080AE&utm_content=TDK, Supplier 2=Digi-Key, Supplier 2 URL=https://www.digikey.com/en/products/detail/tdk-corporation/cga3e2c0g1h103j080ae/11697946, Supplier 3=thegioiic, Supplier 3 Part Number=N/A, Supplier 3 URL=N/A
C2 C8 C9 C10 C11 C14 C16 C17 C19 C20 C21 C22 C23 C24 C25 C26 C27 C28 C29 C30: library part 0106031061010, "CAP, size 0603, 10 uF, 10 VDC, 10%", Capacitance="10 uF", LCSC Part #=C19702, Manufacturer="Samsung Electro-Mechanics", Manufacturer Part Number=CL10A106KP8NNNC, Operating Temperature Max="+ 85 C", Operating Temperature Min="- 40 C", Package / Case=0603, Supplier 1 Part Number=187-CL10A106KP8NNNC, Supplier 2 Part Number=1276-1192-2-ND, Supplier 3 Part Number=N/A, Tolerance=+/-10%, Voltage Rating DC="10 VDC", ComponentLink1Description=Datasheet, ComponentLink1URL=https://www.mouser.vn/datasheet/2/585/MLCC-1837944.pdf, Mount=SMD/SMT, Packaging="Tape and Reel", Supplier 1=Mouser, Supplier 1 URL=https://www.mouser.vn/ProductDetail/Samsung-Electro-Mechanics/CL10A106KP8NNNC?qs=X6jEic%2FHinAlyfRHj7fKwg%3D%3D, Supplier 2=Digi-Key, Supplier 2 URL=https://www.digikey.com/en/products/detail/samsung-electro-mechanics/cl10a106kp8nnnc/3886850, Supplier 3=thegioiic, Supplier 3 URL=https://www.thegioiic.com/tu-gom-0603-10uf-25v
C3 C4 C15: library part 865080553014, "V-Chip, D8 x H10.5mm, 220uF, 35V", Capacitance=220uF, Capacitance Tolerance=+/-20%, LCSC Part #=N/A, Leakage Current=77uA, Manufacturer="Wurth Elektronik", Operating Temperature Max=105°C, Operating Temperature Min=-55°C, Rated Voltage (DC)=35V, Ripple Current=570mA, Supplier 1 Part Number=710-865080553014, Category="Aluminum Electrolytic Capacitors", ComponentLink1Description=Datasheet, ComponentLink1URL=https://www.we-online.com/redexpert/spec/865080553014?ad, Diameter=8mm, Dissipation Factor=14%, Endurance=2000h, Height=10.5mm, Manufacturer Part Number=N/A, Mount="Surface Mount", Packaging="Tape and Reel", Supplier 1=Mouser, Supplier 1 URL=https://www.mouser.com/ProductDetail/Wurth-Elektronik/865080553014?qs=0KOYDY2FL28pPfJzYTQdnQ%3D%3D, Supplier 2=Digi-Key, Supplier 2 Part Number=N/A, Supplier 2 URL=N/A, Supplier 3=thegioiic, Supplier 3 Part Number=N/A, Supplier 3 URL=N/A
C5 C6: library part 0106031062025, "CAP, size 0603, 10 uF, 25 VDC, 20%", Capacitance="10 uF", LCSC Part #=C96446, Manufacturer="Samsung Electro-Mechanics", Manufacturer Part Number=CL10A106MA8NRNC, Operating Temperature Max="+ 85 C", Operating Temperature Min="- 40 C", Package / Case=0603, Supplier 1 Part Number=187-CL10A106MA8NRNC, Supplier 2 Part Number=1276-1869-2-ND, Supplier 3 Part Number=N/A, Tolerance=+/-20%, Voltage Rating DC="25 VDC", ComponentLink1Description=Datasheet, ComponentLink1URL=https://www.mouser.vn/datasheet/2/585/MLCC-1837944.pdf, Mount=SMD/SMT, Packaging="Tape and Reel", Supplier 1=Mouser, Supplier 1 URL=https://www.mouser.vn/ProductDetail/Samsung-Electro-Mechanics/CL10A106MA8NRNC?qs=47mY1nHWefS2vFRvRJVTdQ%3D%3D, Supplier 2=Digi-Key, Supplier 2 URL=https://www.digikey.com/en/products/detail/samsung-electro-mechanics/CL10A106MA8NRNC/3887527?s=N4IgTCBcDaIMIBkCMAGAgqgbAWTQDgDkAlAuEAXQF8g, Supplier 3=thegioiic, Supplier 3 URL=https://www.thegioiic.com/tu-gom-0603-10uf-25v
C7 C18 C31 C32: library part 0106031041050, "CAP, size 0603, 100 nF, 50 VDC, 10%", Capacitance="100 nF", LCSC Part #=C14663, Manufacturer=TDK, Manufacturer Part Number=CGA3E3X8R1H104K080AE, Operating Temperature Max="+ 85 C", Operating Temperature Min="- 40 C", Package / Case=0603, Supplier 1 Part Number=810-CGA3E3X8R1H104KA, Supplier 2 Part Number=445-173697-2-ND, Supplier 3 Part Number=N/A, Tolerance=+/-10%, Voltage Rating DC="50 VDC", ComponentLink1Description=Datasheet, ComponentLink1URL=https://product.tdk.com/system/files/dam/doc/product/capacitor/ceramic/mlcc/catalog/mlcc_automotive_soft_en.pdf?ref_disty=mouser, Mount=SMD/SMT, Packaging="Tape and Reel", Supplier 1=Mouser, Supplier 1 URL=https://www.mouser.com/ProductDetail/TDK/CGA3E3X8R1H104K080AE?qs=nQSIdc08i%252Bd8g3IRRgU2bw%3D%3D&utm_source=mouser-refine-download&utm_medium=file&utm_campaign=CGA3E3X8R1H104K080AE&utm_content=TDK, Supplier 2=Digi-Key, Supplier 2 URL=https://www.digikey.com/en/products/detail/tdk-corporation/cga3e3x8r1h104k080ae/5809262, Supplier 3=thegioiic, Supplier 3 URL=https://www.thegioiic.com/tu-gom-0603-100nf-0-1uf-50v
C13: library part 865080457015, "V-Chip, D10 x H10.5mm, 470uF, 25V", Capacitance=470uF, Capacitance Tolerance=+/-20%, LCSC Part #=N/A, Leakage Current=117.5uA, Manufacturer="Wurth Elektronik", Operating Temperature Max=105°C, Operating Temperature Min=-55°C, Rated Voltage (DC)=25V, Ripple Current=650mA, Supplier 1 Part Number=710-865080457015, Category="Aluminum Electrolytic Capacitors", ComponentLink1Description=Datasheet, ComponentLink1URL=https://www.we-online.com/redexpert/spec/865080457015?ad, Diameter=10mm, Dissipation Factor=14%, Endurance=2000h, Height=10.5mm, Manufacturer Part Number=N/A, Mount="Surface Mount", Packaging="Tape and Reel", Supplier 1=Mouser, Supplier 1 URL=https://www.mouser.com/ProductDetail/Wurth-Elektronik/865080457015?qs=0KOYDY2FL2%252BEKTJa1jxjAQ%3D%3D, Supplier 2=Digi-Key, Supplier 2 Part Number=N/A, Supplier 2 URL=N/A, Supplier 3=thegioiic, Supplier 3 Part Number=N/A, Supplier 3 URL=https://www.thegioiic.com/tu-nhom-smd-470uf-25v-10x10-5mm
D1 D2 D4 D6: library part SS26, "Schottky Diodes & Rectifiers 2.0 Amp 60 Volt 40 Amp IFSM", Forward Current="2 A", Forward Voltage="750 mV", LCSC Part #=C5350986, Manufacturer="Vishay Semiconductors", Manufacturer Part Number=SS26S-E3/5AT, Max Surge Current="40 A", Maximum Diode Capacitance=N/A, Operating Temperature Max="+ 85 C", Operating Temperature Min="- 40 C", Package / Case="SMA (DO-214AC)", Peak Reverse Voltage="60 V", Reverse Current="200 uA", Supplier 1 Part Number=625-SS26S-E3/5AT, Supplier 2 Part Number=SS26S-E3/5ATGITR-ND, ComponentLink1Description=Datasheet, ComponentLink1URL=https://www.vishay.com/doc?89055, Mount=SMD/SMT, Packaging="Tape and Reel", Power Dissipation=N/A, Recovery Time=N/A, Supplier 1=Mouser, Supplier 1 URL=https://www.mouser.vn/ProductDetail/Vishay-General-Semiconductor/SS26S-E3-5AT?qs=tWM4QuTcS4UlRJgxN3V1tg%3D%3D, Supplier 2=Digi-Key, Supplier 2 URL=https://www.digikey.com/en/products/detail/vishay-general-semiconductor-diodes-division/ss26s-e3-5at/2148827, Supplier 3=thegioiic, Supplier 3 Part Number=SS26, Supplier 3 URL=https://www.thegioiic.com/ss26-smb-diode-schottky-2a, Type=Schottky
D3: "Zener Diodes 12V 1.5W", LCSC Part #=C33754, Manufacturer=onsemi, Maximum Reverse Leakage Current="500 nA", Operating Temperature Max="+ 150 C", Operating Temperature Min="- 55 C", Package / Case=SMA, Power Dissipation="500 mW", Supplier 1 Part Number=863-1SMA5927BT3G, Supplier 2 Part Number=N/A, Voltage Tolerance="5 %", Zener Current="125 mA", Zener Voltage="12 V", ComponentLink1Description=Datasheet, ComponentLink1URL=https://www.onsemi.com/PowerSolutions/product.do?id=1SMA5927BT3G, Manufacturer Part Number=1SMA5927BT3G, Mount=SMD/SMT, Packaging="Tape and Reel", Reverse Current="500 nA", Supplier 1=Mouser, Supplier 1 URL=https://www.mouser.vn/ProductDetail/onsemi/1SMA5927BT3G?qs=y2kkmE52mdMhTuIaEBFoKA%3D%3D, Supplier 2=Digi-Key, Supplier 2 URL=N/A, Supplier 3=thegioiic, Supplier 3 Part Number=N/A, Supplier 3 URL=N/A, Type=Zener, Zener Impedance="30 Ohms"
D5: "400W, 32.8V, 5%, Unidirectional, TVS", Package="SMA-2 Taiwan Semiconductor", Check_prices=https://www.snapeda.com/parts/SMAJ28A/taiwan/view-part/?ref=eda, MF="Taiwan Semiconductor", MP=SMAJ28A, SnapEDA_Link=https://www.snapeda.com/parts/SMAJ28A/taiwan/view-part/?ref=snap
D7 D8 D9 D12: "Blue 470nm LED Indication - Discrete 3.3V 0603", Color=Blue, LCSC Part #=C965807, Manufacturer=XINGLIGHT, Operating Temperature Max="+ 85 C", Operating Temperature Min="- 40 C", Package / Case=0603, Supplier 1 Part Number=N/A, ComponentLink1Description=Datasheet, ComponentLink1URL=https://www.lcsc.com/datasheet/C965807.pdf, Manufacturer Part Number=XL-1608UBC-04, Mount=SMD/SMT, Packaging="Tape and Reel", Supplier 1=Mouser, Supplier 1 URL=N/A, Supplier 2=Digi-Key, Supplier 2 Part Number=N/A, Supplier 2 URL=N/A, Supplier 3=thegioiic, Supplier 3 Part Number=N/A, Supplier 3 URL=https://www.thegioiic.com/led-xanh-duong-0603-dan-smd-trong-suot, Type=Clear
D10: library part 1N4148W-E3-18, "Diodes - General Purpose, Power, Switching 100 Volt 500mA 4ns", Forward Current="150 mA", Forward Voltage="1.2 V", LCSC Part #=N/A, Manufacturer="Vishay Semiconductors", Max Surge Current="2 A", Maximum Diode Capacitance="4 pF", Operating Temperature Max="+ 85 C", Operating Temperature Min="- 40 C", Package / Case=SOD-123, Peak Reverse Voltage="100 V", Power Dissipation="350 mW", Reverse Current="5 uA", Supplier 1 Part Number=78-1N4148W-E3-18, Supplier 2 Part Number=1N4148W-E3-18TR-ND, ComponentLink1Description=Datasheet, ComponentLink1URL=https://www.vishay.com/doc?85748, Manufacturer Part Number=1N4148W-E3-18, Mount=SMD/SMT, Packaging="Tape and Reel", Recovery Time="4 ns", Supplier 1=Mouser, Supplier 1 URL=https://www.mouser.vn/ProductDetail/Vishay-Semiconductors/1N4148W-E3-18?qs=bTzheeSci6Q3YaBSBujcdg%3D%3D, Supplier 2=Digi-Key, Supplier 2 URL=https://www.digikey.com/en/products/detail/vishay-general-semiconductor-diodes-division/1n4148w-e3-18/3104163, Supplier 3=thegioiic, Supplier 3 Part Number=1N4148W-E3-18, Supplier 3 URL=https://www.thegioiic.com/1n4148w-e3-18-diode-gen-purp-75v-150ma-sod123, Type=Rectifiers
D11 D13: "Emerald Green 525nm LED Indication - Discrete 3.3V 0603", Color=Green, LCSC Part #=C965804, Manufacturer=XINGLIGHT, Operating Temperature Max="+ 85 C", Operating Temperature Min="- 40 C", Package / Case=0603, Supplier 1 Part Number=N/A, ComponentLink1Description=Datasheet, ComponentLink1URL=https://www.lcsc.com/datasheet/C965807.pdf, Manufacturer Part Number=XL-1608UGC-04, Mount=SMD/SMT, Packaging="Tape and Reel", Supplier 1=Mouser, Supplier 1 URL=N/A, Supplier 2=Digi-Key, Supplier 2 Part Number=N/A, Supplier 2 URL=N/A, Supplier 3=thegioiic, Supplier 3 Part Number=N/A, Supplier 3 URL=https://www.thegioiic.com/led-xanh-la-0603-dan-smd-trong-suot, Type=Clear